# Altium PCB FT8.PcbDoc (part 2 of 2)
Units mm, origin at the board's own origin, x right, y up, seen from the top; angles counter-clockwise.
Board outline 50 x 100 mm, 4 copper layers (Top Layer, Layer 1, Layer 2, Bottom Layer), stack 1.586 mm thick; 161 components, 91 nets, 512 pads, 171 vias.
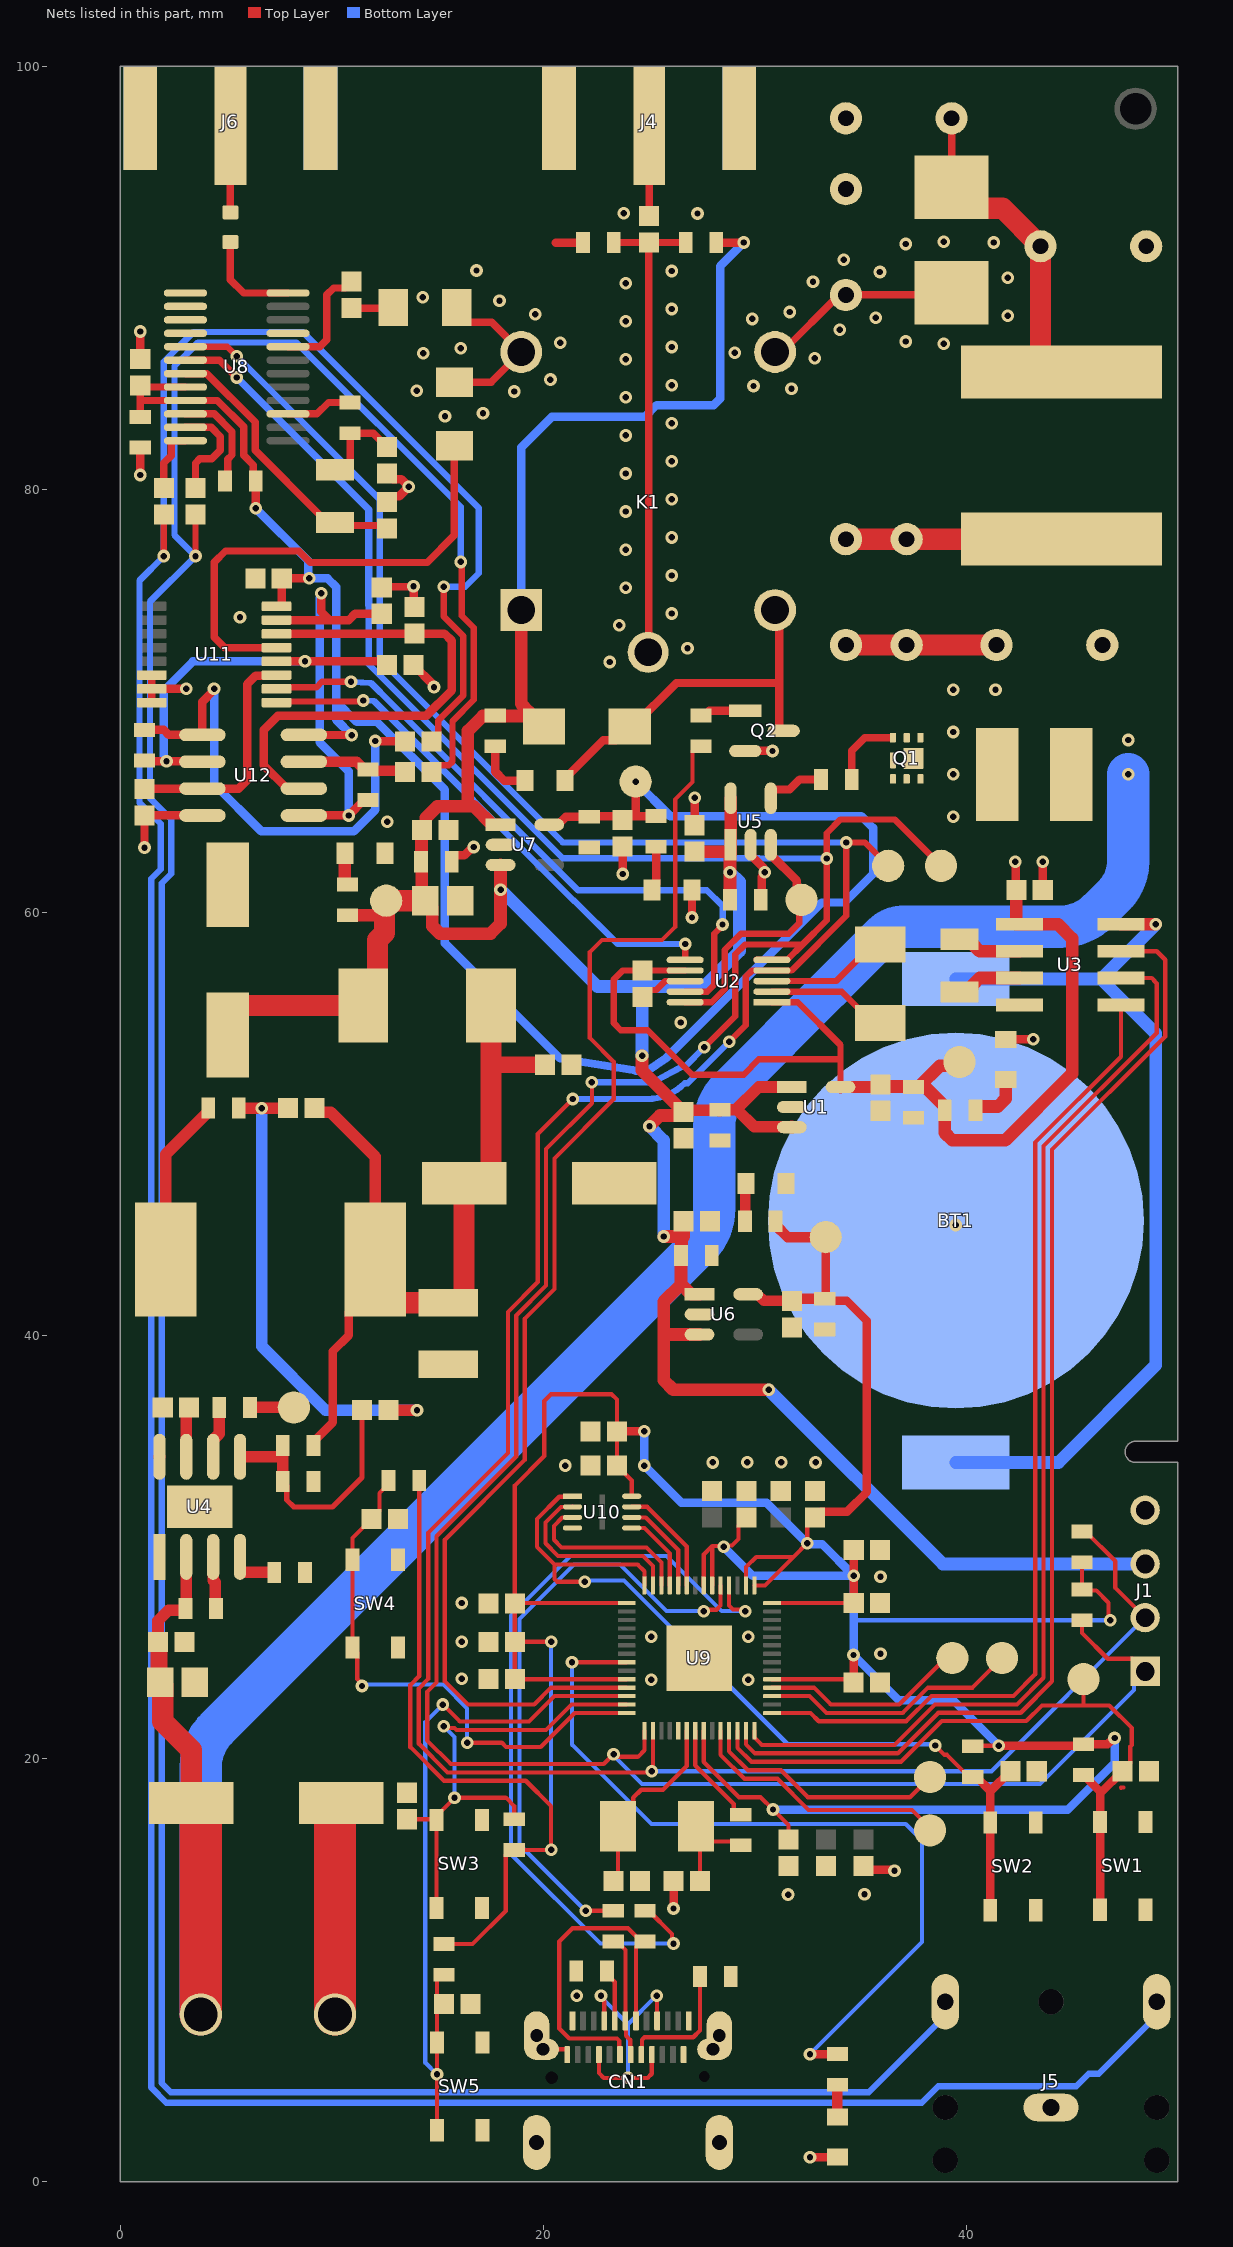
[diagram p4: the nets of this part, all layers, seen from the top]

## Via types
v1: diameter 0.6, hole 0.3, Top Layer to Bottom Layer, tented both sides, 171 vias

## Nets (pads, with @x,y where several pads share a name; then routed paths per layer and width w, separated by ;. In a path a pad name is that pad's centre, name@x,y a point inside that pad or via, vN(x,y) a via of type N, cw(c..) or ccw(c..) an arc to the next point about the centre after c; other vN are vias at no path point) (continued)
+3.3V: C32.2 C33.2 C38.1 C41.2 C42.2 C67.2 R16.1 TP8.0 U7.5 U8.20 U8.21 U11.16 U12.8 | length 93.1
  Top Layer w0.35: C41.2@0.94,83.432 0.94,84.2 ; U8.20@3.075,84.844 1.021,84.844 C42.2@0.94,84.925 0.94,84.2 ; C38.1@6.4,80.4 6.29,80.51 6.29,81.157 5.825,81.622 5.825,82.963 4.578,84.209 U8.21@3.075,84.209 0.949,84.209 0.94,84.2
  Top Layer w0.4: v1(6.4,79.106) C38.1@6.4,80.4 ; U11.16@7.379,74.475 7.604,74.475 7.629,74.5 C67.2@7.629,75.8 v1(8.923,75.8) ; U12.8@8.675,68.397 8.68,68.393 10.926,68.393 v1(10.93,68.388) ; U7.5@20.276,64.15 20.69,64.15 21.065,64.525 C32.2@22.165,64.525 22.184,64.544 24.498,64.544 ; v1(24.361,66.188) 24.361,64.681 24.498,64.544 ; R16.1@25.327,64.563 25.308,64.544 24.498,64.544
  Bottom Layer w0.4: v1(6.4,79.106) 8.885,76.621 8.885,75.838 v1(8.923,75.8) 9.793,75.8 10.203,75.39 10.203,69.973 ; v1(10.93,68.388) 10.203,69.116 10.203,69.973 ; v1(24.361,66.188) 25.998,64.551 35.032,64.551 35.586,63.998 35.586,61.823 34.236,60.473 33.157,60.473 25.781,53.097 24.955,52.528 24.375,52.528 20.791,53.097 15.337,58.551 15.337,65.808 12.138,69.007 11.169,69.007 10.203,69.973
+3.3VC: C3.2 C4.2 C5.1 C6.1 R1.1 TP1.0 U1.5 U2.1 U2.7 U3.1 | length 52.6
  Top Layer w0.3: U2.7@26.7,57.259 C5.1@24.678,57.259 23.749,57.259 23.324,56.834 23.324,54.774 23.659,54.439 24.925,54.439 27.028,52.336 29.469,52.336 30.188,53.055 34.048,53.055 ; U2.1@30.801,55.759 32.021,55.759 34.048,53.733 34.048,53.055 ; U1.5@34.048,51.75 34.048,53.055
  Top Layer w0.4: v1(42.314,62.392) 42.337,62.37 42.337,61.081 C6.1@42.359,61.059
  Top Layer w0.55: U1.5@34.048,51.75 35.806,51.75 C4.2@35.931,51.875
  Top Layer w0.6: U1.5@34.048,51.75 U1.5@34.06,51.762 ; C4.2@35.931,51.875 36.031,51.775 37.475,51.775 C3.2@37.5,51.75 37.525,51.775 37.765,51.775 38.747,52.757 39.498,52.757 TP1.0@39.675,52.934 ; C3.2@37.675,51.75 37.7,51.725 38.075,51.725 38.975,50.825 38.975,49.584 39.334,49.225 41.836,49.225 45,52.389 45,58.779 44.341,59.439 U3.1@42.509,59.439 42.359,59.439 C6.1@42.359,61.059
+5V_UNF: C11.1 C12.2 C14.2 C15.2 L1.2 L2.1 R5.2 | length 41
  Top Layer w0.4: R5.2@9.125,34.8 9.125,34.975 10.05,35.9 10.05,39.262 10.8,40.012 10.8,41.1 11.664,41.964 L1.2@12.586,41.964
  Top Layer w0.55: C11.1@9.175,50.75 9.375,50.55 9.95,50.55 12.05,48.45 L1.2@12.05,43.6
  Top Layer w0.8: 17.525,52.8 C15.2@20.075,52.8
  Top Layer w1: L1.2@12.05,43.6 12.05,42.5 12.586,41.964 13,41.55 C12.2@15.5,41.55 16.1,41.55 16.25,41.7 C14.2@16.25,47.2 17.025,47.2 17.525,47.7 17.525,52.8 L2.1@17.525,55.6
ADC_AVDD: C28.2 C29.2 C47.2 C48.2 C49.2 C50.2 C51.2 C52.2 C53.2 C54.2 C55.2 C56.2 C69.2 R10.1 R12.2 R13.2 R29.2 R30.2 R31.2 R32.2 R33.2 TP7.0 U6.5 U9.1 U9.10 U9.22 U9.33 U9.42 U9.43 U9.44 U9.48 U9.49 U10.8 | length 206.9
  Top Layer w0.2: R30.2@14.125,33.147 14.125,23.891 13.709,23.475 13.709,20.537 15.296,18.95 19.162,18.95 20.363,17.748 v1(20.363,15.68) R29.2@18.617,15.68 18.442,15.68 18.217,15.455 18.217,12.796 16.646,11.225 R31.2@15.294,11.225 ; v1(20.363,25.524) 18.672,25.524 C48.2@18.648,25.5 ; U9.10@23.943,23.75 C49.2@18.648,23.75 C48.2@18.648,25.5 ; U9.1@23.943,27.35 18.671,27.35 C47.2@18.648,27.327 ; U10.8@24.176,32.4 24.176,33.147 C56.2@23.473,33.85 C55.2@23.473,35.468 23.473,36.972 23.224,37.221 20.36,37.221 20.041,36.902 20.041,34.304 18.648,32.911 C47.2@18.648,27.327 ; U9.22@27.578,21.315 27.578,19.842 29.248,18.172 30.269,18.172 v1(30.853,17.587) 31.591,16.849 C50.2@31.591,16.175 ; U9.49@27.578,28.185 27.578,29.643 27.978,30.043 ; U9.48@27.978,28.185 27.978,30.043 ; U9.44@29.578,28.185 29.578,29.049 30.062,29.534 31.826,29.534 ; C53.2@29.6,31.392 29.226,31.018 29.226,30.373 28.919,30.066 28.586,30.066 v1(28.528,30.009) 28.494,30.043 27.978,30.043 ; U9.43@29.978,28.185 30.477,28.185 31.826,29.534 ; U9.33@30.813,23.75 34.512,23.75 C51.2@34.662,23.6 ; U9.42@30.813,27.35 C52.2@34.671,27.35 ; C54.2@32.844,31.392 32.47,31.018 v1(32.47,30.178) 31.826,29.534 ; R13.2@40.3,20.575 40.323,20.598 v1(41.533,20.598) ; R12.2@45.46,20.598 R12.2@45.537,20.675 ; R33.2@45.46,29.284 R32.2@45.46,27.99 45.506,27.944 46.143,27.944 46.721,27.366 46.721,26.617 v1(46.798,26.54) ; C48.2@18.648,25.5 C47.2@18.648,27.327
  Top Layer w0.4: C55.2@23.473,35.468 v1(24.767,35.468) ; C54.2@32.844,31.392 33.119,31.667 34.358,31.667 35.296,32.605 35.296,40.692 34.337,41.651 33.385,41.651 C28.2@33.3,41.736 ; TP7.0@33.324,44.626 33.348,44.602 C28.2@33.348,41.8 ; C51.2@34.662,23.6 v1(34.662,24.894) ; C52.2@34.671,27.35 C69.2@34.671,29.863 ; v1(41.533,20.598) R12.2@45.46,20.598 ; R12.2@45.537,20.675 46.67,20.675 46.969,20.973 v1(47.005,20.973)
  Top Layer w0.5: U6.5@29.679,41.95 30.115,41.95 30.429,41.636 C29.2@31.746,41.636 31.846,41.736 C28.2@33.3,41.736 ; R10.1@30.975,45.4 30.975,45.225 31.55,44.65 TP7.0@33.324,44.65
  Bottom Layer w0.2: v1(20.363,15.68) v1(20.363,25.524) ; 34.667,26.6 34.727,26.54 v1(46.798,26.54)
  Bottom Layer w0.4: v1(24.767,35.468) v1(24.767,33.85) 26.525,32.092 30.556,32.092 v1(32.47,30.178) 32.508,30.139 33.176,30.139 v1(34.671,28.644) ; v1(28.528,30.009) 29.893,28.644 v1(34.671,28.644) ; v1@30.867,17.587 44.799,17.587 47.005,19.793 v1(47.005,20.973) ; v1(41.533,20.598) 39.385,22.746 36.81,22.746 v1(34.662,24.894) 34.667,24.899 34.667,26.6 34.667,28.639 v1(34.671,28.644)
GND: BT1.1 C1.1 C2.1 C3.1 C4.1 C5.2 C6.2 C8.1 C9.1 C10.1 C12.1 C14.1 C15.1 C16.1 C17.1 C18.2 C21.2 C22.1 C23.1 C24.2 C25.1 C26.1 C27.1 C28.1 C29.1 C30.1 C31.1 C32.1 C33.1 C39.1 C40.1 C41.1 C42.1 C43.1 C44.1 C45.1 C46.1 C47.1 C48.1 C49.1 C50.1 C51.1 C52.1 C53.1 C54.1 C55.1 C56.1 C57.1 C58.1 C59.1 C60.1 C61.1 C63.1 C64.1 C65.1 C67.1 C69.1 C70.1 C71.1 C72.1 CN1.1 CN1.2 CN1.3 CN1.4 CN1.A1 CN1.A12 CN1.B1 CN1.B12 D1.2 D2.2 D3.2 D4.2 D5.2 J1.4 J3.2 J4.G J5.1 J6.G Q1.4 Q1.7 Q2.2 R6.1 R7.1 R14.2 R21.1 R28.1 SW1.3 SW1.4 SW2.3 SW2.4 SW3.3 SW3.4 SW4.3 SW4.4 SW5.3 SW5.4 U1.2 U2.8 U3.4 U4.1 U4.9 U5.2 U6.2 U7.2 U8.9 U8.13 U8.14 U8.15 U8.16 U9.19 U9.57 U10.4 U11.6 U11.7 U11.8 U12.4 | length 47.7
  Top Layer w0.2: CN1.1@19.98,6.25 21.09,6.25 21.125,6.215 CN1.B12@21.125,6 ; 47.305,18.623 47.307,18.625 47.432,18.625
  Top Layer w0.3: C5.2@24.678,56.009 25.003,56.334 25.34,56.334 25.765,56.759 U2.8@26.7,56.759
  Top Layer w0.35: U11.8@1.479,69.925 U11.7@1.479,70.575 U11.6@1.479,71.225 ; C64.1@12.358,75.375 12.38,75.397 13.837,75.397 v1(13.859,75.419)
  Top Layer w0.4: v1(0.94,80.688) C41.1@0.94,81.982 ; C42.1@0.94,86.175 v1(0.94,87.469) ; v1(1.14,63.069) C65.1@1.14,64.363 ; C65.1@1.14,64.588 U12.4@3.875,64.588 ; U11.7@1.825,70.575 v1(3.119,70.575) ; C40.1@12.611,79.407 12.886,79.682 13.184,79.682 v1(13.634,80.132) 13.284,80.482 12.886,80.482 C39.1@12.611,80.757 ; C61.1@13.859,71.7 14.789,70.771 14.789,70.696 v1(14.827,70.657) ; v1(13.859,75.419) 13.88,75.399 13.88,74.458 C63.1@13.9,74.438 ; C30.1@15.667,62.397 15.667,62.572 15.792,62.697 16.256,62.697 16.659,63.1 v1(16.713,63.1) ; 20.581,91.675 R28.1@21.875,91.675 ; v1(23.748,61.823) C33.1@23.748,63.117 ; v1(26.153,12.907) C46.1@26.153,14.201 ; v1(27.025,59.765) D5.2@27.025,61.059 ; C21.2@27.15,64.125 v1(27.15,65.419) ; Q2.2@29.54,67.638 v1(30.834,67.638) ; U5.2@29.8,63.2 29.8,62.713 30.421,62.092 30.421,61.939 v1(30.459,61.9) ; C18.2@30.275,60.6 30.275,60.862 30.313,60.9 30.313,61.7 30.459,61.846 v1@30.459,61.905 ; v1(32.606,1.15) D4.2@33.9,1.15 ; C59.1@35.141,15.1 35.141,15.013 35.416,14.738 36.563,14.738 v1(36.601,14.7) ; D1.2@41.859,54 v1(43.153,54) ; C6.2@43.609,61.059 v1(43.609,62.392)
  Top Layer w2: J3.2@10.15,7.9 10.15,17.9 C8.1@10.45,17.9
  other v1: 21.575,8.79 31.568,13.567 35.184,13.589 25.103,23.726 29.686,23.726 16.134,23.774 35.936,24.958 16.134,25.524 25.103,25.759 29.686,25.759 16.134,27.351 35.936,28.6 21.026,33.85 28.002,34 29.631,34.007 31.246,34.002 32.868,34 39.5,45.225 26.495,54.801 12.611,64.295 23.131,71.84 26.815,72.499 23.58,73.583 5.654,73.954 26.061,74.134 23.889,75.357 26.061,75.934 23.889,77.157 26.061,77.734 23.889,78.957 26.061,79.534 23.889,80.757 26.061,81.334 23.889,82.557 26.061,83.134 15.348,83.467 17.142,83.604 23.889,84.357 18.622,84.629 14.01,84.67 31.73,84.769 29.935,84.894 26.061,84.934 20.331,85.196 23.889,86.157 32.824,86.198 14.313,86.445 29.051,86.463 16.097,86.682 26.061,86.734 38.929,86.892 20.799,86.934 37.132,86.999 34.008,87.554 23.889,87.957 29.872,88.065 35.719,88.114 41.958,88.207 19.607,88.282 31.641,88.395 26.061,88.534 17.923,88.918 14.292,89.091 23.889,89.757 32.747,89.815 41.958,90.007 35.91,90.286 26.061,90.334 16.835,90.352 34.207,90.869 37.137,91.603 41.285,91.677 38.934,91.708 27.285,93.052 23.793,93.064
GPIO6: R15.1 U9.8 | length 38.5
  Top Layer w0.2: v1(21.354,24.55) U9.8@23.943,24.55
  Top Layer w0.4: v1(32.606,6.025) R15.1@33.9,6.025
  Bottom Layer w0.2: v1(21.354,24.55) 21.354,20.656 25.109,16.9 37.134,16.9 37.906,16.129 37.906,11.325 v1(32.606,6.025)
GPIO9: C72.2 R31.1 SW5.1 SW5.2 U9.12 | length 35.1
  Top Layer w0.2: SW5.1@14.965,2.429 v1(14.965,5.068) SW5.2@14.965,6.579 14.965,9.55 15.19,9.775 R31.1@15.294,9.775 ; v1(15.244,22.55) 16.049,21.745 19.317,21.745 20.522,22.95 U9.12@23.943,22.95
  Bottom Layer w0.2: v1(14.965,5.068) 14.417,5.615 14.417,21.723 v1(15.244,22.55)
GPIO10: C70.2 R29.1 SW3.1 SW3.2 U9.13 | length 23.4
  Top Layer w0.2: C70.2@13.559,17.13 14.901,17.13 SW3.2@14.942,17.088 ; SW3.1@14.942,12.938 SW3.2@14.942,17.088 ; v1(15.294,21.519) 15.371,21.443 15.793,21.443 15.886,21.35 20.123,21.35 21.323,22.55 U9.13@23.943,22.55 ; R29.1@18.617,17.13 18.617,17.755 18.223,18.15 v1(15.793,18.15) 15.793,18.139 14.942,17.288 SW3.2@14.942,17.088
  Bottom Layer w0.2: v1(15.294,21.519) 15.793,21.02 v1(15.793,18.15)
GPIO11: C71.2 R30.1 SW4.1 SW4.2 U9.14 | length 26
  Top Layer w0.2: v1(11.425,23.427) 11.425,23.535 11.2,23.76 11.2,25.027 SW4.1@10.975,25.252 SW4.2@10.975,29.402 10.975,30.425 C71.2@11.875,31.325 12.25,31.7 12.25,32.547 12.675,32.972 R30.1@12.675,33.147 ; v1(16.393,20.75) 18.032,20.75 18.237,20.545 19.876,20.545 21.481,22.15 U9.14@23.943,22.15
  Bottom Layer w0.2: v1(11.425,23.427) 11.497,23.499 15.268,23.499 16.393,22.374 v1(16.393,20.75)
LM5164_FB: C13.1 R5.1 R7.2 U4.5 | length 12.1
  Top Layer w0.25: R7.2@7.675,33.1 7.867,32.908 7.867,32.225 8.2,31.892 10.025,31.892 11.425,33.292 C13.1@11.425,36.471 ; 7.675,34.25 R5.1@7.675,34.8
  Top Layer w0.55: U4.5@5.655,34.266 7.659,34.266 7.675,34.25 R7.2@7.675,33.1
LM5164_SW: C7.1 L1.1 R3.2 U4.8 | length 8.2
  Top Layer w0.55: U4.8@1.845,34.266 U4.8@1.851,34.272 ; C7.1@1.851,36.451 C7.1@2,36.6 ; L1.1@2.15,43.6 2.15,48.575 4.15,50.575 R3.2@4.15,50.75
MCU_D_N: R11.1 U9.46 | length 38.1
  Top Layer w0.2: R11.1@24.803,12.8 24.978,12.8 26.076,11.701 26.076,11.327 v1(26.153,11.25) ; U9.46@28.778,28.185 28.778,27.232 28.964,27.046 29.472,27.046 v1(29.549,26.969)
  Bottom Layer w0.2: v1(26.153,11.25) 22.699,11.25 18.473,15.476 18.473,26.764 21.284,29.575 25.82,29.575 28.426,26.969 v1(29.549,26.969)
MCU_D_P: R22.1 U9.47 | length 28.9
  Top Layer w0.2: v1(21.998,12.8) R22.1@23.303,12.8 ; v1(27.578,26.969) 27.641,27.032 28.178,27.032 28.378,27.232 U9.47@28.378,28.185
  Bottom Layer w0.2: v1(21.998,12.8) 18.873,15.925 18.873,26.598 21.449,29.175 23.62,29.175 25.826,26.969 v1(27.578,26.969)
MCU_SD0: U9.53 U10.5 | length 3.8
  Top Layer w0.2: U10.5@24.176,30.9 24.775,30.9 25.978,29.698 U9.53@25.978,28.185
MCU_SD1: U9.55 U10.2 | length 9
  Top Layer w0.2: U10.2@21.375,31.9 21.367,31.892 20.827,31.892 20.094,31.16 20.094,30.175 20.694,29.575 24.703,29.575 25.178,29.101 U9.55@25.178,28.185
MCU_SD2: U9.54 U10.3 | length 8.3
  Top Layer w0.2: U10.3@21.375,31.4 21.367,31.392 20.892,31.392 20.494,30.994 20.494,30.34 20.86,29.975 24.869,29.975 25.578,29.266 U9.54@25.578,28.185
MCU_SD3: U9.51 U10.7 | length 5.2
  Top Layer w0.2: U10.7@24.176,31.9 24.907,31.9 26.778,30.029 26.778,29.947 U9.51@26.778,28.185
MCU_SS: C44.2 R13.1 SW2.1 SW2.2 U9.56 U10.1 | length 42.1
  Top Layer w0.2: U10.1@21.375,32.4 21.354,32.379 20.748,32.379 19.694,31.325 19.694,30.009 20.528,29.175 ; v1(21.954,28.361) 20.646,28.361 20.528,28.478 20.528,29.175 ; U9.56@24.778,28.185 24.778,28.852 24.455,29.175 20.528,29.175 ; v1(38.526,20.612) 38.964,20.173 39.077,20.173 40.125,19.125 R13.1@40.3,19.125
  Top Layer w0.4: R13.1@40.3,19.125 40.475,19.125 41.125,18.475 ; SW2.1@41.125,12.825 SW2.2@41.125,16.975 41.125,18.475 ; C44.2@42.075,19.4 41.15,18.475 41.125,18.475
  Bottom Layer w0.2: v1(21.954,28.361) 22.012,28.419 23.81,28.419 31.554,20.675 38.463,20.675 v1(38.526,20.612)
MCU_SWCLK: U9.52 U10.6 | length 4.5
  Top Layer w0.2: U10.6@24.176,31.4 24.841,31.4 26.378,29.863 U9.52@26.378,28.185
MCU_XIN: C45.2 U9.20 Y4.2 | length 9.2
  Top Layer w0.2: C45.2@23.318,14.201 23.523,14.406 Y4.2@23.523,16.801 24.249,17.526 24.249,18.15 24.626,18.526 25.656,18.526 26.778,19.649 U9.20@26.778,21.315
MCU_XOUT: R20.2 U9.21 | length 4.8
  Top Layer w0.2: U9.21@27.178,21.315 27.178,19.676 29,17.854 29,17.571 29.046,17.526 R20.2@29.328,17.526
NetBT1_2: BT1.2 U3.8 | length 42.8
  Top Layer w0.6: U3.8@47.309,59.439 v1(48.95,59.439)
  Bottom Layer w0.6: BT1.2@39.5,34 44.35,34 48.95,38.6 48.95,54.281 46.371,56.86 ; BT1.2@39.5,56.86 46.371,56.86 ; v1(48.95,59.439) 46.371,56.86
NetC1_2: C1.2 C2.2 C16.2 C17.2 C18.1 C21.1 C26.2 C27.2 C30.2 C31.2 D6.2 J1.3 K1.A1 L2.2 R8.1 R18.1 R27.2 TP5.0 U1.1 U1.3 U5.1 U5.5 U6.1 U6.3 U7.1 U7.3 | length 157.4
  Top Layer w0.4: R27.2@28.175,91.675 v1(29.469,91.675)
  Top Layer w0.55: C2.2@26.703,50.65 C1.2@28.326,50.65 ; C1.2@28.351,50.675 29.101,50.675 30.176,51.75 U1.1@31.746,51.75 ; 29.175,50.65 29.963,49.862 U1.3@31.734,49.862
  Top Layer w0.6: R8.1@10.73,59.875 12.358,59.875 12.48,59.753 ; 16.425,65.02 16.425,68.577 17.137,69.288 17.7,69.288 R18.1@17.725,69.313 17.75,69.288 D6.2@19.375,69.288 ; U7.3@17.974,62.25 17.974,59.474 17.5,59 15.1,59 14.742,59.358 14.742,60.234 C17.2@14.417,60.559 14.242,60.733 14.242,62.372 C30.2@14.217,62.397 14.238,62.418 14.238,63.872 C31.2@14.259,63.893 14.434,64.068 14.434,64.475 14.979,65.02 16.713,65.02 17.583,64.15 U7.1@17.974,64.15 ; K1.A1@18.95,74.3 18.95,69.863 19.325,69.488 19.325,69.338 D6.2@19.375,69.288 ; D6.2@20.025,68.788 19.525,69.288 D6.2@19.375,69.288 ; v1(24.665,53.228) 24.665,52.538 C2.2@26.628,50.575 ; v1(25.013,49.9) 25.513,50.4 26.453,50.4 C2.2@26.628,50.575 ; v1(25.684,44.679) 26.625,44.679 C27.2@26.625,45.4 ; C26.2@26.505,43.789 26.505,42.42 25.684,41.599 25.684,40.036 ; 26.53,42.406 26.986,41.95 U6.1@27.378,41.95 ; C26.2@26.53,43.789 26.53,44.679 ; C2.2@26.703,50.65 C2.2@26.628,50.575 ; C21.1@27.15,62.875 28.836,62.875 U5.1@28.85,62.889 ; U6.3@27.378,40.05 25.699,40.05 25.684,40.036 ; C1.2@28.326,50.65 C1.2@28.351,50.675 ; C18.1@28.825,60.6 v1(28.825,61.897) 28.825,62.736 28.85,62.761 U5.1@28.85,62.889 ; U5.5@28.85,65.4 U5.1@28.85,63.2 U5.1@28.85,62.889 ; v1(30.649,37.437) 26.14,37.437 25.684,37.894 25.684,40.036 ; U1.3@31.734,49.862 U1.3@31.746,49.85
  Top Layer w1: C16.2@5.075,54.209 5.075,55.1 5.575,55.6 L2.2@11.475,55.6 12.15,56.275 12.15,58.702 12.48,59.032 12.48,59.753 12.48,60.473 TP5.0@12.566,60.559 C17.2@14.417,60.559
  Bottom Layer w0.4: K1.A1@18.95,74.3 18.95,81.988 20.394,83.432 24.793,83.432 25.351,83.99 28.051,83.99 28.35,84.289 28.35,90.556 v1(29.469,91.675)
  Bottom Layer w0.6: v1(17.974,61.081) 22.556,56.5 24.678,56.5 ; v1(24.665,53.228) 24.678,55.651 24.678,56.5 ; v1(25.013,49.9) 25.684,49.228 v1(25.684,44.679) ; v1(28.825,61.897) 29.271,61.451 29.271,58.181 27.589,56.5 24.678,56.5 ; v1(30.649,37.437) 38.887,29.2 J1.3@48.45,29.2
NetC7_2: C7.2 U4.7 | length 2.4
  Top Layer w0.55: U4.7@3.115,34.266 3.121,34.272 3.121,36.471 C7.2@3.25,36.6
NetC8_2: C8.2 C9.2 C10.2 J3.1 L3.2 R2.2 U4.2 | length 105.2
  Top Layer w0.55: C9.2@1.775,25.5 1.775,26.507 2.276,27.008 3.025,27.008 3.075,27.058 R2.2@3.075,27.1 3.109,27.134 3.109,29.528 U4.2@3.115,29.534
  Top Layer w0.8: C9.2@1.775,25.5 1.825,25.45 1.825,23.65 C10.2@1.875,23.6
  Top Layer w1: C10.2@1.875,23.6 2,23.475 2,21.75 3.35,20.4 C8.2@3.35,17.9
  Top Layer w2: C8.2@3.35,17.9 3.8,17.9 J3.1@3.8,7.9
  Bottom Layer w2: J3.1@3.8,7.9 3.8,19.621 cw(c6.34,19.621) 4.544,21.417 27.333,44.206 ccw(c25.537,46.002) 28.077,46.002 28.077,49.892 cw(c30.617,49.892) 28.821,51.688 33.555,56.422 36.111,58.979 cw(c36.96,58.13) 36.112,58.98 cw(c36.96,58.13) 36.96,59.33 44.449,59.33 ccw(c44.449,61.87) 46.245,60.074 46.976,60.805 ccw(c45.349,62.432) 47.65,62.432 v1(47.65,66.533)
  other v1: 47.65,68.152
NetC11_2: C11.2 C13.2 R3.1 | length 23.5
  Top Layer w0.55: R3.1@5.6,50.75 v1(6.679,50.75) C11.2@7.925,50.75 ; C13.2@12.675,36.471 C13.2@12.7,36.471 ; C13.2@12.698,36.473 C13.2@12.7,36.471 ; v1@14.018,36.471 C13.2@12.7,36.471
  Bottom Layer w0.55: v1(6.679,50.75) 6.679,39.49 9.698,36.471 v1@14.02,36.471
  other v1: 14.02,36.469
NetC19_1: C19.1 C20.2 L5.1 | length 10.2
  Top Layer w1: C19.1@34.3,77.65 C20.2@37.175,77.65 L5.1@44.5,77.65
NetC19_2: C19.2 C20.1 C25.2 L3.1 Q1.1 Q1.2 Q1.5 Q1.6 Q1.8 | length 7.1
  Top Layer w1: C19.2@34.3,72.65 C20.1@37.175,72.65 C25.2@41.425,72.65
  other v1: 39.375,64.532 39.375,66.533 39.375,68.534 39.375,70.535 41.376,70.535
NetC22_2: C22.2 C23.2 L4.1 L5.2 | length 15.1
  Top Layer w0.349: L4.1@39.3,94.3 C23.2@39.3,97.55
  Top Layer w1: L4.1@39.3,94.3 40.3,93.3 41.7,93.3 C22.2@43.5,91.5 43.5,86.3 44.25,85.55 L5.2@44.5,85.55
NetC24_1: C24.1 K1.NO L4.2 | length 9.5
  Top Layer w0.349: K1.NO@30.95,86.5 31.282,86.5 33.982,89.2 C24.1@34.3,89.2 39.2,89.2 L4.2@39.3,89.3
NetC34_1: C34.1 J6.1 | length 4.1
  Top Layer w0.349: C34.1@5.2,93.1 J6.1@5.2,97.2
NetC34_2: C34.2 U8.12 | length 4.8
  Top Layer w0.349: C34.2@5.2,91.7 5.2,89.914 5.825,89.289 U8.12@7.925,89.289
NetC35_1: C35.1 U8.24 | length 3
  Top Layer w0.35: C35.1@2.054,80.075 2.054,81.254 2.4,81.6 2.4,82.304 U8.24@3.075,82.304
NetC35_2: C35.2 C62.2 J5.2 | length 167.1
  Top Layer w0.3: v1(2.054,76.851) C35.2@2.054,78.825 ; C62.2@14.709,68.092 15.034,68.417 15.034,69.08 16.213,70.258 16.213,73.074 15.292,73.995 v1(15.292,75.399)
  Bottom Layer w0.3: v1(15.292,75.399) 16.312,75.399 16.95,76.037 16.95,79.124 8.628,87.447 3.459,87.447 2.054,86.042 v1(2.054,76.851) 0.9,75.697 0.9,65.196 1.9,64.196 1.9,62.037 1.452,61.589 1.452,4.448 2.175,3.725 37.881,3.725 38.66,4.504 45.191,4.504 45.787,5.1 46.254,5.1 49,7.846 J5.2@49,8.5
NetC36_2: C36.2 U8.8 | length 5.5
  Top Layer w0.349: U8.8@7.925,86.749 9.424,86.749 9.76,87.085 9.76,89.2 10.085,89.525 10.63,89.525 C36.2@10.93,89.825
NetC37_1: C37.1 U8.23 | length 5.1
  Top Layer w0.35: U8.23@3.075,82.939 4.293,82.939 4.725,82.507 4.725,81.857 4.315,81.447 3.755,81.447 3.55,81.242 C37.1@3.55,80.075
NetC37_2: C37.2 C66.2 J5.3 | length 155.6
  Top Layer w0.3: v1(3.55,76.851) C37.2@3.55,78.825 ; C66.2@14.709,66.638 15.034,66.963 15.527,66.963 15.702,67.139 15.702,69.041 16.713,70.051 16.713,73.462 16.141,74.034 16.141,76.525 v1(16.09,76.576)
  Bottom Layer w0.3: v1(16.09,76.576) 16.09,79.176 8.32,86.947 3.666,86.947 2.554,85.835 2.554,77.847 v1(3.55,76.851) 1.4,74.701 1.4,65.403 2.4,64.403 2.4,61.83 1.952,61.382 1.952,4.655 2.382,4.225 35.379,4.225 39,7.846 J5.3@39,8.5
NetC38_2: C38.2 U8.22 | length 5
  Top Layer w0.35: U8.22@3.075,83.574 4.436,83.574 5.275,82.735 5.275,81.629 5.071,81.425 5.071,80.521 C38.2@4.95,80.4
NetC39_2: C39.2 R17.2 Y3.2 | length 4.3
  Top Layer w0.349: Y3.2@10.14,80.932 10.535,80.932 10.861,81.258 R17.2@10.861,82.664 11.954,82.664 C39.2@12.611,82.007
NetC46_2: C46.2 R20.1 Y4.1 | length 4.8
  Top Layer w0.2: Y4.1@27.223,16.801 Y4.1@27.403,16.621 ; C46.2@27.403,14.201 Y4.1@27.403,16.621 ; R20.1@29.328,16.076 27.948,16.076 Y4.1@27.403,16.621
NetC62_1: C62.1 R23.1 U12.1 | length 23.4
  Top Layer w0.4: R23.1@1.14,68.63 2.054,68.63 2.287,68.397 U12.1@3.875,68.397 3.875,69.967 4.429,70.521 v1(4.429,70.575) ; v1(12.05,68.106) 12.057,68.099 13.453,68.099 C62.1@13.459,68.092
  Bottom Layer w0.4: v1(4.429,70.575) 4.429,66.068 6.659,63.838 11.04,63.838 12.05,64.848 v1(12.05,68.106)
NetC66_1: C66.1 R26.1 U12.7 | length 5
  Top Layer w0.5: U12.7@8.675,67.127 11.161,67.127 11.525,66.763 R26.1@11.7,66.763 11.762,66.701 13.397,66.701 C66.1@13.459,66.638
NetC68_1: C68.1 J4.1 | length 4.3
  Top Layer w0.349: C68.1@25,92.925 J4.1@25,97.2
NetC68_2: C68.2 K1.COM R27.1 R28.2 | length 22.8
  Top Layer w0.349: R28.2@23.325,91.675 C68.2@25,91.675 ; K1.COM@24.95,72.3 24.975,72.325 24.975,91.65 C68.2@25,91.675 ; R27.1@26.725,91.675 C68.2@25,91.675
NetCN1_A5: CN1.A5 R14.1 | length 2.5
  Top Layer w0.2: R14.1@23.001,9.95 23.001,9.775 23.226,9.55 23.258,9.55 23.375,9.433 CN1.A5@23.375,7.6
NetCN1_B5: CN1.B5 R21.2 | length 6.2
  Top Layer w0.2: CN1.B5@24.625,6 24.66,6.035 24.66,6.704 24.777,6.821 27.086,6.821 27.403,7.138 R21.2@27.403,9.7
NetD1_1: D1.1 R1.2 | length 2.7
  Top Layer w0.6: R1.2@40.425,50.65 40.425,50.8 40.45,50.825 41.484,50.825 41.859,51.2 D1.1@41.859,52.1
NetD2_1: D2.1 R8.2 | length 1.6
  Top Layer w0.6: D2.1@10.61,62.804 10.61,61.35 10.635,61.325 R8.2@10.73,61.325
NetD3_1: D3.1 R10.2 | length 1.8
  Top Layer w0.5: R10.2@29.525,45.4 29.549,45.423 29.549,47.166 D3.1@29.572,47.189
NetD4_1: D4.1 R15.2 | length 1.5
  Top Layer w0.5: D4.1@33.9,3.05 R15.2@33.9,4.575
NetD5_1: D5.1 R16.2 | length 2.1
  Top Layer w0.4: D5.1@25.125,61.059 25.125,61.159 25.327,61.361 R16.2@25.327,63.113
NetD6_1: D6.1 D7.2 K1.A2 Q2.3 | length 18.1
  Top Layer w0.4: D7.2@21.025,66.238 21.025,66.338 22.825,68.138 23.425,68.138 D6.1@24.075,68.788 24.225,68.788 26.287,70.85 31.155,70.85 ; K1.A2@30.95,74.3 31.155,74.095 31.155,70.85 ; Q2.3@31.36,68.588 31.237,68.588 31.155,68.67 31.155,70.85
NetD7_1: D7.1 R18.2 | length 2.8
  Top Layer w0.4: R18.2@17.725,67.863 17.725,66.653 18.139,66.238 D7.1@19.125,66.238
NetJ1_1: J1.1 R32.1 TP2.0 U2.5 U8.18 U9.15 | length 152.3
  Top Layer w0.2: v1(22.292,51.975) 22.292,50.983 20.127,48.818 20.127,42.361 18.717,40.951 18.717,34.278 14.945,30.506 14.945,23.594 14.504,23.153 14.504,20.859 15.623,19.74 22.85,19.74 v1(23.318,20.208) ; v1@23.318,20.15 23.388,20.079 24.465,20.079 24.778,20.392 U9.15@24.778,21.315 ; R32.1@45.46,26.54 45.46,25.937 46.683,24.714 47.855,24.714 J1.1@48.45,24.12
  Top Layer w0.3: v1(27.608,53.626) 29.074,55.092 29.074,58.023 29.534,58.484 32.25,58.484 ; U2.5@30.076,57.759 U2.5@30.801,57.759 31.525,57.759 32.25,58.484 ; TP2.0@38.8,62.208 36.614,64.394 34.043,64.394 33.397,63.749 v1(33.397,62.55) 33.397,59.63 32.25,58.484
  Top Layer w0.35: U8.18@3.075,86.114 4.683,86.114 v1(5.5,85.297)
  Bottom Layer w0.2: v1(23.318,20.208) 23.318,20.15 24.667,18.801 43.483,18.801 47.925,23.243 47.925,23.595 J1.1@48.45,24.12
  Bottom Layer w0.3: 11.743,74.518 11.743,71.734 20.915,62.561 30.194,62.561 30.205,62.55 v1(33.397,62.55) ; v1(22.292,51.975) 24.764,51.975 25.183,51.978 26.56,52.719 ; 26.561,52.72 26.701,52.72 v1(27.608,53.626)
  Bottom Layer w0.35: v1(5.5,85.297) 11.743,79.054 11.743,74.518
NetJ1_2: J1.2 R33.1 TP3.0 U2.4 U8.17 U9.16 | length 147.8
  Top Layer w0.2: v1(21.387,51.182) 19.732,49.527 19.732,42.524 18.322,41.114 18.322,34.441 14.55,30.669 14.55,23.758 14.109,23.316 14.109,20.696 15.46,19.345 25.069,19.345 25.178,19.454 U9.16@25.178,21.315 ; R33.1@45.46,30.734 45.635,30.734 47.041,29.328 47.041,28.069 J1.2@48.45,26.66
  Top Layer w0.3: U8.17@3.075,86.749 5.047,86.749 v1(5.5,86.297) ; v1(28.791,53.89) 29.574,54.673 29.574,56.967 29.866,57.259 31.733,57.259 34.325,59.851 v1(34.325,63.312) 35.196,63.312 TP3.0@36.301,62.208
  Bottom Layer w0.2: v1(25.125,19.401) 41.191,19.401 J1.2@48.45,26.66
  Bottom Layer w0.3: v1(5.5,86.297) 12.268,79.529 12.268,71.966 20.921,63.312 v1(34.325,63.312) ; v1(21.387,51.182) 24.89,51.182 ccw(c24.89,53.722) 26.686,51.926 26.827,51.926 v1(28.791,53.89)
NetK1_NC: K1.NC R24.1 R25.1 | length 7.8
  Top Layer w0.349: R25.1@15.792,85.074 17.524,85.074 K1.NC@18.95,86.5 17.55,87.9 16.425,87.9 15.9,88.425 R24.1@15.9,88.6
NetQ1_3: Q1.3 R9.2 | length 3.4
  Top Layer w0.35: R9.2@34.585,66.298 34.585,67.648 35.2,68.263 Q1.3@36.384,68.263
  Top Layer w0.4: R9.2@34.575,66.288 R9.2@34.585,66.298
NetQ2_1: Q2.1 R19.2 | length 2.2
  Top Layer w0.4: R19.2@27.45,69.313 27.625,69.313 27.85,69.538 Q2.1@29.54,69.538
NetR2_1: R2.1 U4.3 | length 2.5
  Top Layer w0.55: U4.3@4.385,29.534 4.391,29.528 4.391,28.418 4.481,28.328 4.481,27.144 R2.1@4.525,27.1
NetR4_1: R4.1 U4.6 | length 2.5
  Top Layer w0.55: U4.6@4.385,34.266 4.385,35.071 4.675,35.361 R4.1@4.675,36.6
NetR4_2: R4.2 TP4.0 | length 2.1
  Top Layer w0.55: R4.2@6.125,36.6 TP4.0@8.2,36.6
NetR6_2: R6.2 U4.4 | length 2.3
  Top Layer w0.55: U4.4@5.655,29.534 5.655,28.815 5.67,28.8 R6.2@7.275,28.8
NetR9_1: R9.1 U5.4 | length 2.9
  Top Layer w0.4: U5.4@30.75,65.4 30.75,65.736 30.83,65.815 31.636,65.815 32.109,66.288 R9.1@33.125,66.288
NetR17_1: R17.1 U8.3 | length 3.2
  Top Layer w0.349: U8.3@7.925,83.574 9.298,83.574 9.837,84.114 R17.1@10.861,84.114
NetR19_1: R19.1 U9.11 | length 61.3
  Top Layer w0.2: U9.11@23.943,23.35 20.363,23.35 19.563,22.55 16.437,22.55 15.34,23.647 15.34,30.342 19.112,34.114 19.112,40.787 20.522,42.197 20.522,48.372 23.324,51.174 23.324,52.938 22.196,54.066 22.196,58.128 22.77,58.702 25.611,58.702 26.228,59.319 26.228,65.346 27.05,66.168 27.05,67.638 27.275,67.863 R19.1@27.45,67.863
NetTP6_0: TP6.0 U2.10 U5.3 | length 12.4
  Top Layer w0.3: U2.10@26.7,55.759 27.958,55.759 28.574,56.375 28.574,58.23 29.344,59 31.595,59 32.088,59.493 32.088,60.488 TP6.0@32.2,60.6
  Top Layer w0.4: U5.3@30.75,63.2 30.75,62.733 31.985,61.498 31.985,60.815 TP6.0@32.2,60.6
NetTP10_0: TP10.0 U9.24 | length 12.3
  Top Layer w0.2: U9.24@28.378,21.315 28.378,20.173 29.506,19.045 31.062,19.045 32.539,17.568 37.432,17.568 37.975,17.025 TP10.0@38.277,17.025
NetTP11_0: TP11.0 U9.25 | length 11.8
  Top Layer w0.2: U9.25@28.778,21.315 28.778,20.339 29.672,19.445 31.228,19.445 32.501,18.172 37.324,18.172 TP11.0@38.277,19.125
NetTP12_0: TP12.0 U9.31 | length 12.3
  Top Layer w0.2: U9.31@30.813,22.95 32.585,22.95 33.38,22.155 36.986,22.155 38.181,23.35 40.284,23.35 TP12.0@41.684,24.75
NetTP13_0: TP13.0 U9.32 | length 9.8
  Top Layer w0.2: U9.32@30.813,23.35 32.788,23.35 33.588,22.55 36.822,22.55 39.022,24.75 TP13.0@39.334,24.75
NetU2_2: U2.2 Y1.2 | length 5.7
  Top Layer w0.3: U2.2@30.801,56.259 34.1,56.259 35.575,54.784 Y1.2@35.925,54.784
NetU2_3: U2.3 Y1.1 | length 5.8
  Top Layer w0.3: U2.3@30.801,56.759 33.85,56.759 35.575,58.484 Y1.1@35.925,58.484
NetU2_6: U2.6 U11.9 | length 24.9
  Top Layer w0.3: U11.9@7.379,69.925 7.427,69.973 11.435,69.973 v1(11.483,70.022) ; U2.6@26.7,57.759 26.7,58.506 v1(26.703,58.509)
  Bottom Layer w0.3: v1(11.483,70.022) 11.975,70 ccw(c11.99,70.3) 11.99,70 21.431,60.559 21.464,60.559 23.514,58.509 v1(26.703,58.509)
NetU2_9: U2.9 U11.10 | length 31
  Top Layer w0.3: U11.10@7.379,70.575 7.454,70.65 9.274,70.65 9.528,70.903 v1(10.903,70.903) ; U2.9@26.7,56.259 27.75,56.259 28.074,56.582 28.074,58.994 28.465,59.385 v1(28.465,59.434)
  Bottom Layer w0.3: v1(10.903,70.903) 11.786,70.851 ccw(c11.803,71.15) 11.803,70.85 11.847,70.85 12.784,69.913 21.638,61.059 27.726,61.059 28.475,60.31 28.475,59.444 v1(28.465,59.434)
NetU3_2: U3.2 Y2.2 | length 3.1
  Top Layer w0.6: Y2.2@39.675,58.734 40.075,58.734 40.275,58.534 40.275,58.52 40.626,58.169 U3.2@42.509,58.169
NetU3_3: U3.3 Y2.1 | length 3.2
  Top Layer w0.6: Y2.1@39.675,56.234 40.075,56.234 40.275,56.434 40.275,56.547 40.626,56.899 U3.3@42.509,56.899
NetU3_5: U3.5 U9.29 | length 46.8
  Top Layer w0.2: U9.29@30.813,22.15 32.63,22.15 33.02,21.76 37.149,21.76 38.344,22.955 42.224,22.955 43.25,23.981 43.25,49.124 47.309,53.183 U3.5@47.309,55.629
NetU3_6: U3.6 U9.28 | length 52.3
  Top Layer w0.2: U9.28@29.978,21.315 29.978,20.995 30.328,20.645 36.593,20.645 38.508,22.56 42.394,22.56 43.65,23.816 43.65,48.958 49,54.308 49,56.641 48.883,56.759 48.883,56.782 48.766,56.899 U3.6@47.309,56.899
NetU3_7: U3.7 U9.27 | length 55.3
  Top Layer w0.2: U9.27@29.578,21.315 29.578,20.67 30.003,20.245 36.752,20.245 38.672,22.165 42.565,22.165 44.05,23.65 44.05,48.793 49.4,54.143 49.4,57.767 48.999,58.169 U3.7@47.309,58.169
RCLK: C40.2 U8.19 Y3.1 | length 13.4
  Top Layer w0.349: U8.19@3.075,85.479 4.086,85.479 6.375,83.19 6.375,81.849 9.415,78.809 9.415,78.758 9.74,78.432 Y3.1@10.14,78.432 10.278,78.295 12.474,78.295 C40.2@12.611,78.157
RUN: C43.2 R12.1 SW1.1 SW1.2 TP9.0 U9.26 | length 33.1
  Top Layer w0.2: U9.26@29.178,21.315 29.178,20.505 29.838,19.845 36.91,19.845 38.835,21.77 42.83,21.77 43.568,22.508 45.537,22.508 45.613,22.508 ; R12.1@45.362,19.225 R12.1@45.537,19.225 ; TP9.0@45.537,23.75 45.537,22.584 45.613,22.508 ; C43.2@47.375,19.4 47.75,19.775 47.75,20.571 47.821,20.642 47.821,21.438 46.751,22.508 45.613,22.508
  Top Layer w0.4: R12.1@45.537,19.225 46.317,18.444 46.317,18.342 ; SW1.1@46.317,12.851 SW1.2@46.317,17.001 46.317,18.342 ; C43.2@47.375,19.4 46.317,18.342
SI_RX: C36.1 R24.2 | length 2
  Top Layer w0.349: C36.1@10.93,88.575 12.875,88.575 R24.2@12.9,88.6
SN_RX: R25.2 U11.13 | length 23.3
  Top Layer w0.349: U11.13@7.379,72.525 4.925,72.525 4.429,73.021 4.429,76.555 4.968,77.094 8.432,77.094 8.976,76.55 14.509,76.55 15.792,77.833 R25.2@15.792,82.074
USB_D_N: CN1.A7 CN1.B7 R11.2 | length 16.1
  Top Layer w0.2: CN1.B7@23.625,6 23.59,6.035 23.59,6.646 23.473,6.763 21.222,6.763 20.748,7.238 20.748,11.352 21.371,11.975 24.003,11.975 24.628,11.35 24.375,11.097 CN1.A7@24.375,7.6
USB_D_P: CN1.A6 CN1.B6 R22.2 | length 5.8
  Top Layer w0.2: R22.2@23.303,11.35 23.478,11.35 23.875,10.952 CN1.A6@23.875,7.6 23.91,7.565 23.91,6.892 24.102,6.7 24.102,6.023 CN1.B6@24.125,6
VBUS: CN1.A4 CN1.A9 CN1.B4 CN1.B9 | length 13.2
  Top Layer w0.2: CN1.B9@22.625,6 22.625,5.125 22.85,4.9 v1(24,4.9) 24.928,4.9 25.125,5.097 CN1.B4@25.125,6 ; v1(22.721,8.79) 22.721,8.682 22.875,8.528 CN1.A4@22.875,7.6 ; v1(25.353,8.79) 25.364,8.779 25.364,7.611 CN1.A9@25.375,7.6
  Bottom Layer w0.2: v1(22.721,8.79) 22.721,8.716 23.999,7.439 ; v1@23.999,4.901 23.999,7.439 ; v1@25.35,8.79 23.999,7.439
Y0: C61.2 R23.2 U11.12 U12.2 | length 18.7
  Top Layer w0.4: R23.2@1.14,67.18 1.167,67.154 v1(2.179,67.154) 3.848,67.154 U12.2@3.875,67.127 ; U11.12@7.379,71.875 v1(8.724,71.875) 12.434,71.875 C61.2@12.609,71.7
  Bottom Layer w0.4: v1(2.179,67.154) 2.179,67.208 2.054,67.333 2.054,70.5 3.429,71.875 v1(8.724,71.875)
Y1: C63.2 U11.14 U12.6 | length 24.5
  Top Layer w0.4: U11.14@7.379,73.175 7.385,73.181 13.894,73.181 C63.2@13.9,73.188 15.322,73.188 15.663,72.846 15.663,70.504 14.459,69.3 7.445,69.3 6.775,68.63 6.775,66.957 7.875,65.857 U12.6@8.675,65.857
Y2: C64.2 R26.2 U11.15 U12.5 | length 21
  Top Layer w0.4: U11.15@7.379,73.825 9.891,73.825 ; U12.5@8.675,64.587 v1(10.799,64.587) 11.525,65.313 R26.2@11.7,65.313 ; v1(9.503,75.1) 9.503,74.213 9.891,73.825 ; C64.2@12.358,74.125 11.1,74.125 10.8,73.825 9.891,73.825
  Bottom Layer w0.4: v1(9.503,75.1) 9.465,75.062 9.465,74.92 9.424,74.88 9.424,68.043 10.799,66.668 v1(10.799,64.587)
Y3: C65.2 U11.11 U12.3 | length 11.1
  Top Layer w0.4: C65.2@1.14,65.838 1.15,65.848 3.865,65.848 U12.3@3.875,65.857 5.594,65.857 6,66.263 6,70.8 6.4,71.2 7.354,71.2 U11.11@7.379,71.225
pads on no net: CN1.A2 CN1.A3 CN1.A8 CN1.A10 CN1.A11 CN1.B2 CN1.B3 CN1.B8 CN1.B10 CN1.B11 CN1.H1 CN1.H2 J5. U1.4 U6.4 U7.4 U8.1 U8.2 U8.4 U8.5 U8.6 U8.7 U8.10 U8.11 U9.2 U9.3 U9.4 U9.5 U9.6 U9.7 U9.9 U9.17 U9.18 U9.30 U9.34 U9.35 U9.36 U9.37 U9.38 U9.39 U9.40 U9.41 U10.9 U11.1 U11.2 U11.3 U11.4 U11.5

## Polygon pours and split planes (outlines as drawn)
GND on Top Layer "GND_L01_P007" (solid, pour order 7): 0,0 0,100 50,100 50,35 48,35 ccw(c48,34.5) 48,34 50,34 50,0
GND on Top Layer "Top Layer-GND" (solid, pour order 12): 16.915,90.649 17.208,90.528 17.459,90.334 17.653,90.083 17.774,89.79 17.815,89.475 17.815,89.264 17.856,89.256 17.931,89.231 17.941,89.229 18.009,89.215 18.081,89.18 18.156,89.154 18.214,89.116 18.222,89.11 18.274,89.084 18.294,89.075 18.352,89.036 18.411,88.984 18.478,88.939 18.504,88.909 18.536,88.885 18.726,88.695 18.791,88.704 18.95,88.704 19.109,88.704 19.367,88.67 19.613,88.604 19.674,88.587 19.914,88.488 20.189,88.329 20.396,88.17 20.62,87.946 20.779,87.739 20.846,87.623 20.938,87.464 21.037,87.224 21.12,86.917 21.154,86.659 21.154,86.5 21.154,86.341 21.12,86.083 21.054,85.837 21.037,85.776 20.938,85.536 20.779,85.261 20.62,85.054 20.396,84.83 20.189,84.671 20.073,84.604 19.914,84.512 19.674,84.413 19.367,84.33 19.109,84.296 18.95,84.296 18.791,84.296 18.726,84.305 18.51,84.089 18.478,84.065 18.452,84.035 18.394,83.996 18.385,83.99 18.325,83.938 18.268,83.899 18.196,83.864 18.13,83.82 18.055,83.794 17.983,83.759 17.915,83.745 17.905,83.743 17.83,83.718 17.761,83.704 17.682,83.699 17.672,83.697 17.666,83.696 17.527,83.515 17.275,83.322 16.982,83.2 16.667,83.159 14.917,83.159 14.603,83.2 14.31,83.322 14.058,83.515 13.865,83.767 13.743,84.06 13.702,84.374 13.702,85.774 13.743,86.089 13.865,86.382 14.058,86.634 14.31,86.827 14.362,86.849 14.341,86.866 14.147,87.117 14.026,87.41 13.985,87.725 13.985,89.475 14.026,89.79 14.147,90.083 14.341,90.334 14.592,90.528 14.885,90.649 15.2,90.69 16.6,90.69
GND on Top Layer "Top Layer-GND 1" (solid, pour order 11): 155 vertices, not listed, extent 28.746,84.296 42.265,92.015
GND on Top Layer "Top Layer-GND 2" (solid, pour order 10): 27.365,93.349 27.658,93.228 27.909,93.034 28.103,92.783 28.224,92.49 28.265,92.175 28.265,91.175 28.224,90.86 28.103,90.567 27.909,90.316 27.658,90.122 27.365,90.001 27.05,89.96 26.4,89.96 26.369,89.964 26.369,73.963 26.38,73.954 26.604,73.73 26.759,73.528 26.802,73.454 26.918,73.253 27.016,73.018 27.098,72.711 27.131,72.459 27.131,72.141 27.098,71.889 27.016,71.582 26.918,71.347 26.847,71.224 26.759,71.072 26.604,70.87 26.38,70.646 26.178,70.491 26.104,70.448 25.903,70.332 25.668,70.234 25.361,70.152 25.109,70.119 24.791,70.119 24.539,70.152 24.232,70.234 23.997,70.332 23.874,70.403 23.722,70.491 23.52,70.646 23.296,70.87 23.141,71.072 23.098,71.146 22.982,71.347 22.884,71.582 22.802,71.889 22.769,72.141 22.769,72.459 22.802,72.711 22.884,73.018 22.982,73.253 23.053,73.376 23.141,73.528 23.296,73.73 23.52,73.954 23.581,74.001 23.581,89.96 23,89.96 22.685,90.001 22.392,90.122 22.141,90.316 21.947,90.567 21.826,90.86 21.785,91.175 21.785,92.175 21.826,92.49 21.947,92.783 22.141,93.034 22.392,93.228 22.685,93.349 23,93.39 23.65,93.39 23.965,93.349 24.118,93.286 24.21,93.324 24.525,93.365 25.475,93.365 25.79,93.324 25.907,93.275 26.085,93.349 26.4,93.39 27.05,93.39
NetC8_2 on Top Layer "E_AMP_DC" (solid, pour order 0): 43.766,64.123 43.768,64.125 48.766,64.125 48.999,64.358 48.999,68.622 48.7,68.921 43.768,68.921
NetC19_2 on Top Layer "E_AMP_DC" (solid, pour order 2): 37.021,73.734 42.007,73.734 42.621,73.12 42.621,64.125 38.613,64.125 37.021,65.718
LM5164_SW on Top Layer "E_AMP_DC" (solid, pour order 4): 1.552,33.85 2.133,33.85 2.133,35.083 2.472,35.422 2.472,39.472 3.6,40.6 3.6,47.064 3.464,47.2 0.816,47.2 0.6,46.984 0.6,37.725 0.6,34.802
GND on Bottom Layer "GND_L04_P008" (solid, pour order 8): 0,0 0,100 50,100 50,35 48,35 ccw(c48,34.5) 48,34 50,34 50,0
NetC8_2 on Bottom Layer "E_AMP_DC" (solid, pour order 6): 43.766,64.123 43.768,64.125 48.766,64.125 48.999,64.358 48.999,68.622 48.7,68.921 43.768,68.921
NetC19_2 on Bottom Layer "E_AMP_DC" (solid, pour order 1): 37.021,73.734 42.007,73.734 42.621,73.12 42.621,64.125 38.613,64.125 37.021,65.718
GND on Layer 1 "GND_L02_P003" (solid, pour order 3): 0,0 0,100 50,100 50,35 48,35 ccw(c48,34.5) 48,34 50,34 50,0
GND on Layer 2 "GND_L03_P009" (solid, pour order 9): 0,0 0,100 50,100 50,35 48,35 ccw(c48,34.5) 48,34 50,34 50,0

## Silkscreen, mask and mechanical layers (free items; w line width, h text height)
Top Overlay:
  the board outline again, w0.1
  text "AM" at 8.574,92.829 h1.52
  text "FM" at 27.664,92.829 h1.52
  text "CallMeC" at 47.832,35.636 h1.01 r90
  text "FT8 TRX Rev : 001" at 49.552,35.636 h1.01 r90
  text "RUN" at 46.798,14.681 h0.5
  text "BOOT" at 41.284,14.634 h0.5
Bottom Overlay:
  text "CR2032" at 42.341,58.651 h1.01
  text "VCC" at 5.141,5.068 h1.01
  text "GND" at 11.491,5.068 h1.01
  text "6V-48V" at 9.632,0.617 h1.01

## Text inside footprints (layer, text, board x,y; h text height)
CN1: Top 3D Body "Board Edge" at 22.9,-0.4 h0.5
J4: Top Assembly "PCB EDGE" at 20.4,97.7 h1.02 r180
J5: Top Assembly "PCB EDGE" at 51,0.25 h0.81
J6: Top Assembly "PCB EDGE" at -0.3,99.75 h1.02 r180